# Altium PCB TF-SMD_THD2528-11SD-GF.pcbdoc
Units mm, origin at the board's own origin, x right, y up, seen from the top; angles counter-clockwise.
Board outline 29.4 x 28.77 mm, 2 copper layers (Top Layer, Bottom Layer), stack 0 mm thick; 1 components, 0 nets, 13 pads, 0 vias.
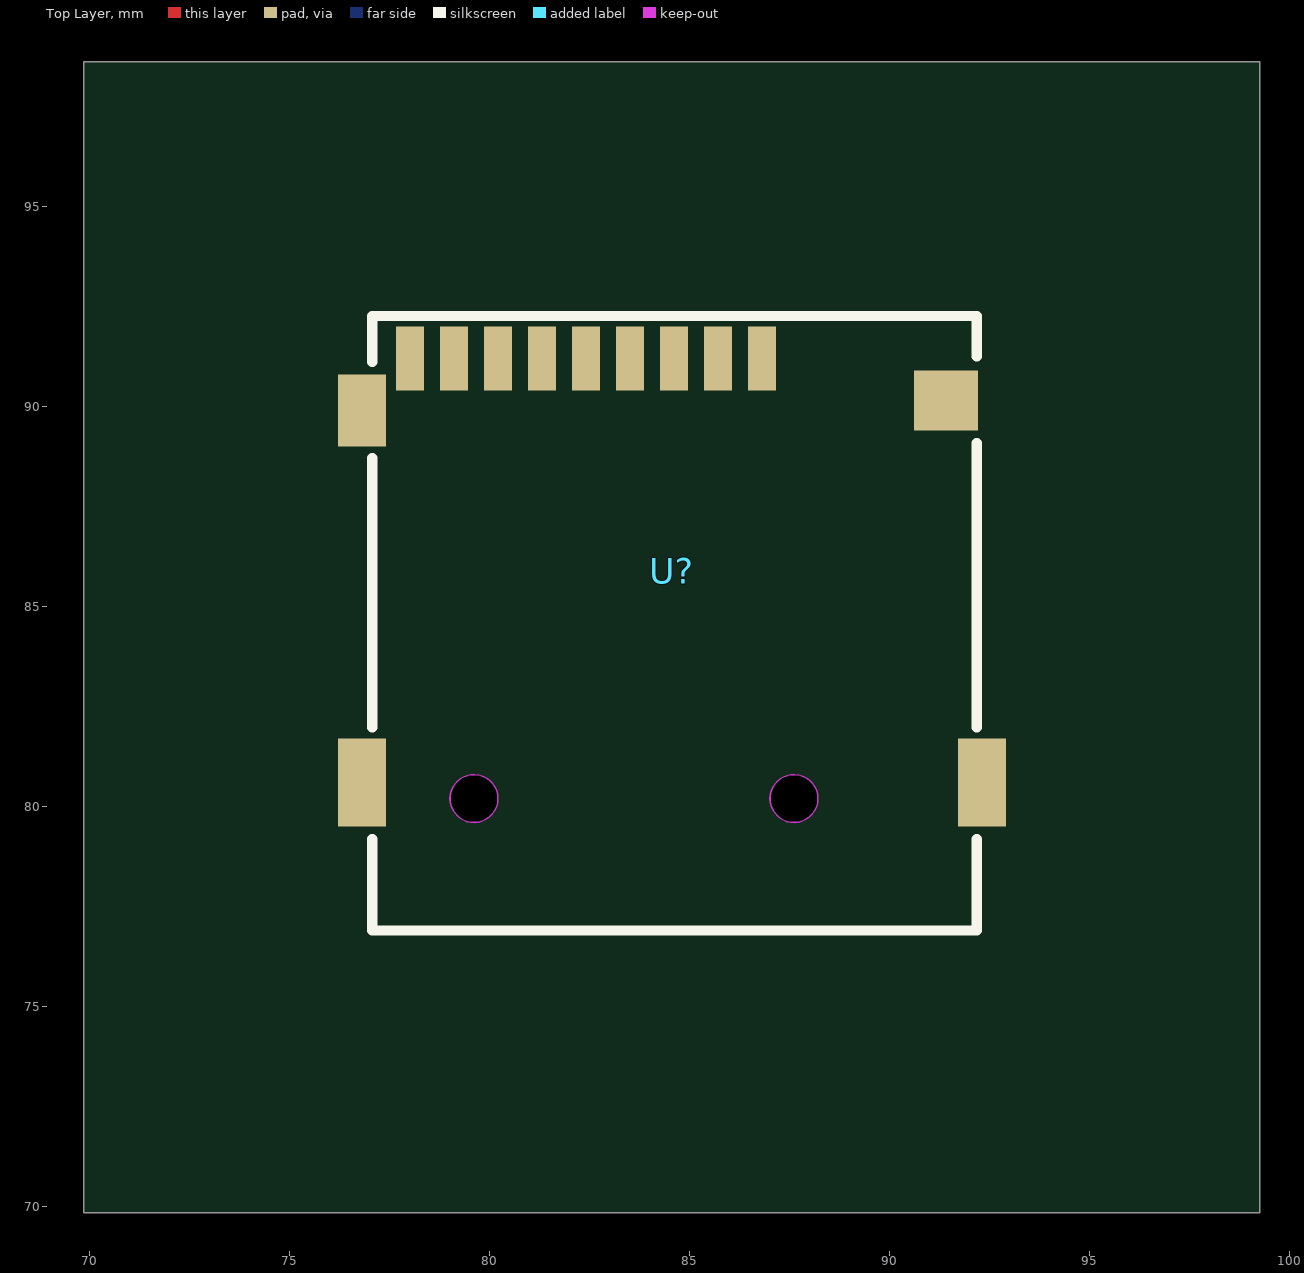
[diagram p0: Top Layer view]
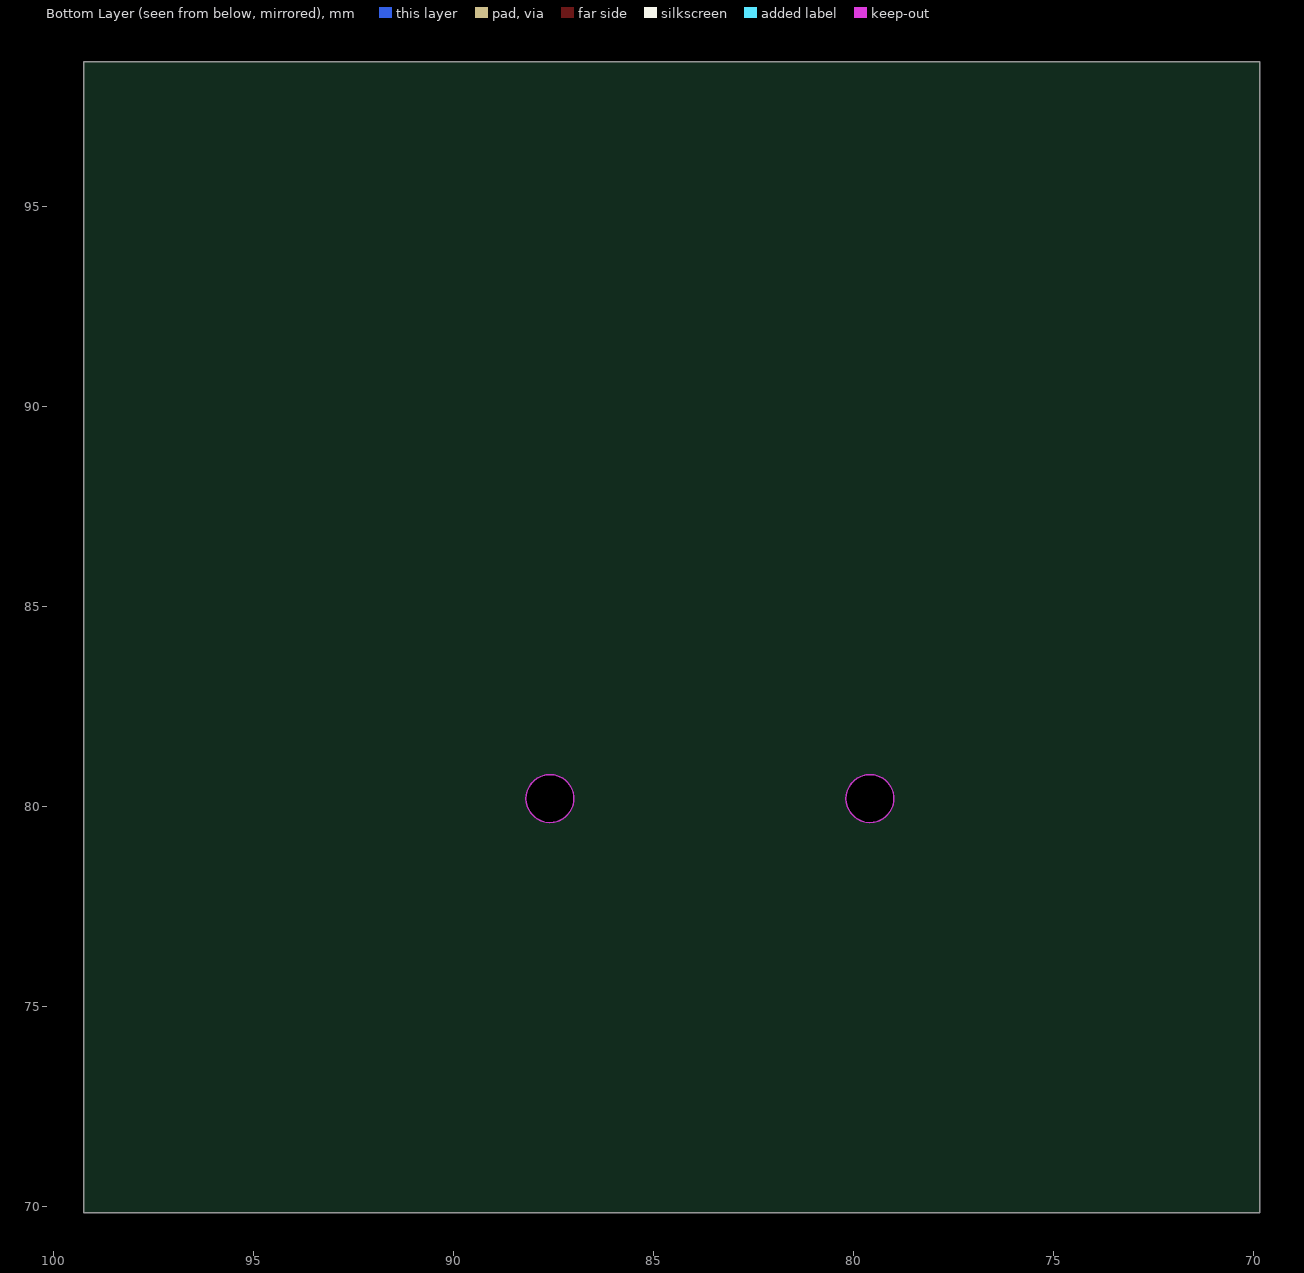
[diagram p1: Bottom Layer view, seen from below]

## Layer stack, top to bottom
Top Layer: signal copper (thickness not stored)
Bottom Layer: signal copper (thickness not stored)

## Board outline
99.25,69.85 69.85,69.85 69.85,98.615 99.25,98.615

## Components (designator, comment, footprint, x,y, rotation, side; value= is the part's Value field where it differs from the comment)
U? "" TF-SMD_THD2528-11SD-GF 84.55,85.901 r0 top

## Footprints (in the part's own frame and the unit in brackets; to place one, negate y for a bottom-side part, rotate by r counter-clockwise, add the part's x,y. Pads: shape width x height; smd on the part's side, far side on the other; paste and mask are expansions set on the pad)
TF-SMD_THD2528-11SD-GF [mm]
  rect 0.7x1.6 smd: 1(2.25,5.3) 2(1.15,5.3) 3(0.05,5.3) 4(-1.05,5.3) 5(-2.15,5.3) 6(-3.25,5.3) 7(-4.35,5.3) 8(-5.45,5.3) 9(-6.55,5.3)
  rect 1.2x1.8 smd: 10(-7.75,4)
  rect 1.2x2.2 smd: 11(-7.75,-5.3) 12(7.75,-5.3)
  rect 1.6x1.5 smd: 13(6.85,4.25)
  Board Outline Layer circle w0.003: c3.05,-5.7 r0.6
  Board Outline Layer circle w0.003: c-4.95,-5.7 r0.6
  Board Outline Layer region: 3.65,-5.7 3.591,-5.96 3.424,-6.169 3.184,-6.285 2.917,-6.285 2.676,-6.169 2.509,-5.96 2.45,-5.7 2.45,-5.7 2.509,-5.44 2.676,-5.231 2.917,-5.115 3.184,-5.115 3.424,-5.231 3.591,-5.44 3.65,-5.7
  Board Outline Layer region: 3.65,-5.7 3.641,-5.804 3.614,-5.905 3.57,-6 3.51,-6.086 3.436,-6.16 3.35,-6.22 3.255,-6.264 3.154,-6.291 3.05,-6.3 2.946,-6.291 2.845,-6.264 2.75,-6.22 2.664,-6.16 2.59,-6.086 2.53,-6 2.486,-5.905 2.459,-5.804 2.45,-5.7 2.459,-5.596 2.486,-5.495 2.53,-5.4 2.59,-5.314 2.664,-5.24 2.75,-5.18 2.845,-5.136 2.946,-5.109 3.05,-5.1 3.154,-5.109 3.255,-5.136 3.35,-5.18 3.436,-5.24 3.51,-5.314 3.57,-5.4 3.614,-5.495 3.641,-5.596
  Board Outline Layer region: -4.35,-5.7 -4.409,-5.96 -4.576,-6.169 -4.816,-6.285 -5.083,-6.285 -5.324,-6.169 -5.491,-5.96 -5.55,-5.7 -5.55,-5.7 -5.491,-5.44 -5.324,-5.231 -5.083,-5.115 -4.816,-5.115 -4.576,-5.231 -4.409,-5.44 -4.35,-5.7
  Board Outline Layer region: -4.35,-5.7 -4.359,-5.804 -4.386,-5.905 -4.43,-6 -4.49,-6.086 -4.564,-6.16 -4.65,-6.22 -4.745,-6.264 -4.846,-6.291 -4.95,-6.3 -5.054,-6.291 -5.155,-6.264 -5.25,-6.22 -5.336,-6.16 -5.41,-6.086 -5.47,-6 -5.514,-5.905 -5.541,-5.804 -5.55,-5.7 -5.541,-5.596 -5.514,-5.495 -5.47,-5.4 -5.41,-5.314 -5.336,-5.24 -5.25,-5.18 -5.155,-5.136 -5.054,-5.109 -4.95,-5.1 -4.846,-5.109 -4.745,-5.136 -4.65,-5.18 -4.564,-5.24 -4.49,-5.314 -4.43,-5.4 -4.386,-5.495 -4.359,-5.596
  Multi-Layer board cut-out: 3.65,-5.7 3.591,-5.96 3.424,-6.169 3.184,-6.285 2.917,-6.285 2.676,-6.169 2.509,-5.96 2.45,-5.7 2.45,-5.7 2.509,-5.44 2.676,-5.231 2.917,-5.115 3.184,-5.115 3.424,-5.231 3.591,-5.44 3.65,-5.7
  Multi-Layer board cut-out: -4.35,-5.7 -4.409,-5.96 -4.576,-6.169 -4.816,-6.285 -5.083,-6.285 -5.324,-6.169 -5.491,-5.96 -5.55,-5.7 -5.55,-5.7 -5.491,-5.44 -5.324,-5.231 -5.083,-5.115 -4.816,-5.115 -4.576,-5.231 -4.409,-5.44 -4.35,-5.7
  silkscreen extent -7.49,-9 7.62,6.36

## Nets (pads, with @x,y where several pads share a name; then routed paths per layer and width w, separated by ;. In a path a pad name is that pad's centre, name@x,y a point inside that pad or via, vN(x,y) a via of type N, cw(c..) or ccw(c..) an arc to the next point about the centre after c; other vN are vias at no path point)
pads on no net: U?.1 U?.2 U?.3 U?.4 U?.5 U?.6 U?.7 U?.8 U?.9 U?.10 U?.11 U?.12 U?.13